# Altium PCB Than_.PcbDoc
Units mm, origin at the board's own origin, x right, y up, seen from the top; angles counter-clockwise.
Board outline 50.8 x 51.18 mm, 2 copper layers (Top Layer, Bottom Layer); 48 components, 41 nets, 161 pads, 79 vias.
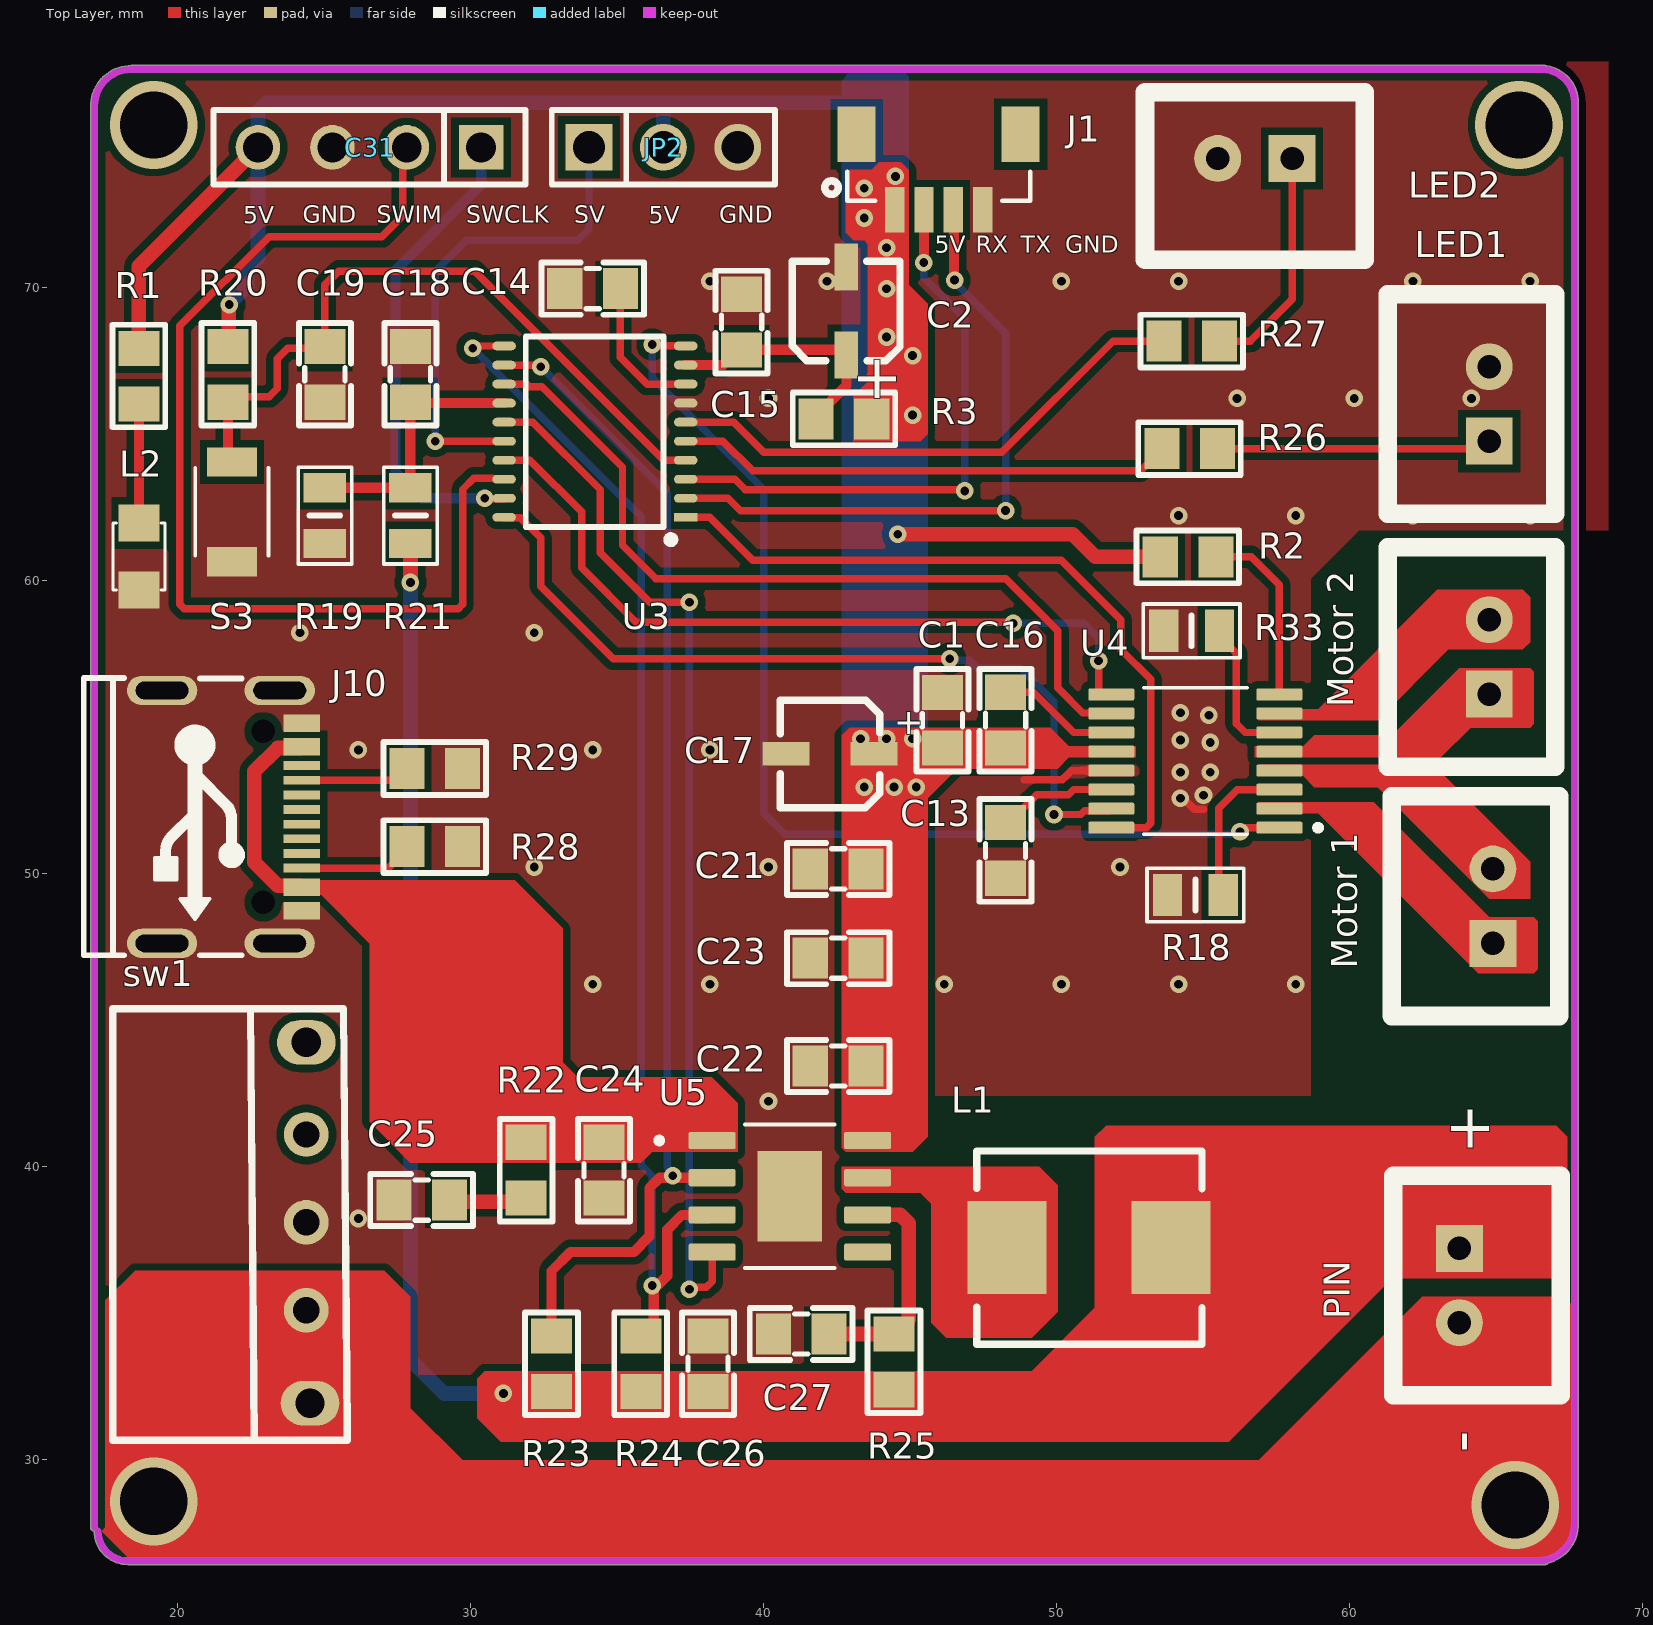
[diagram p0: Top Layer view]
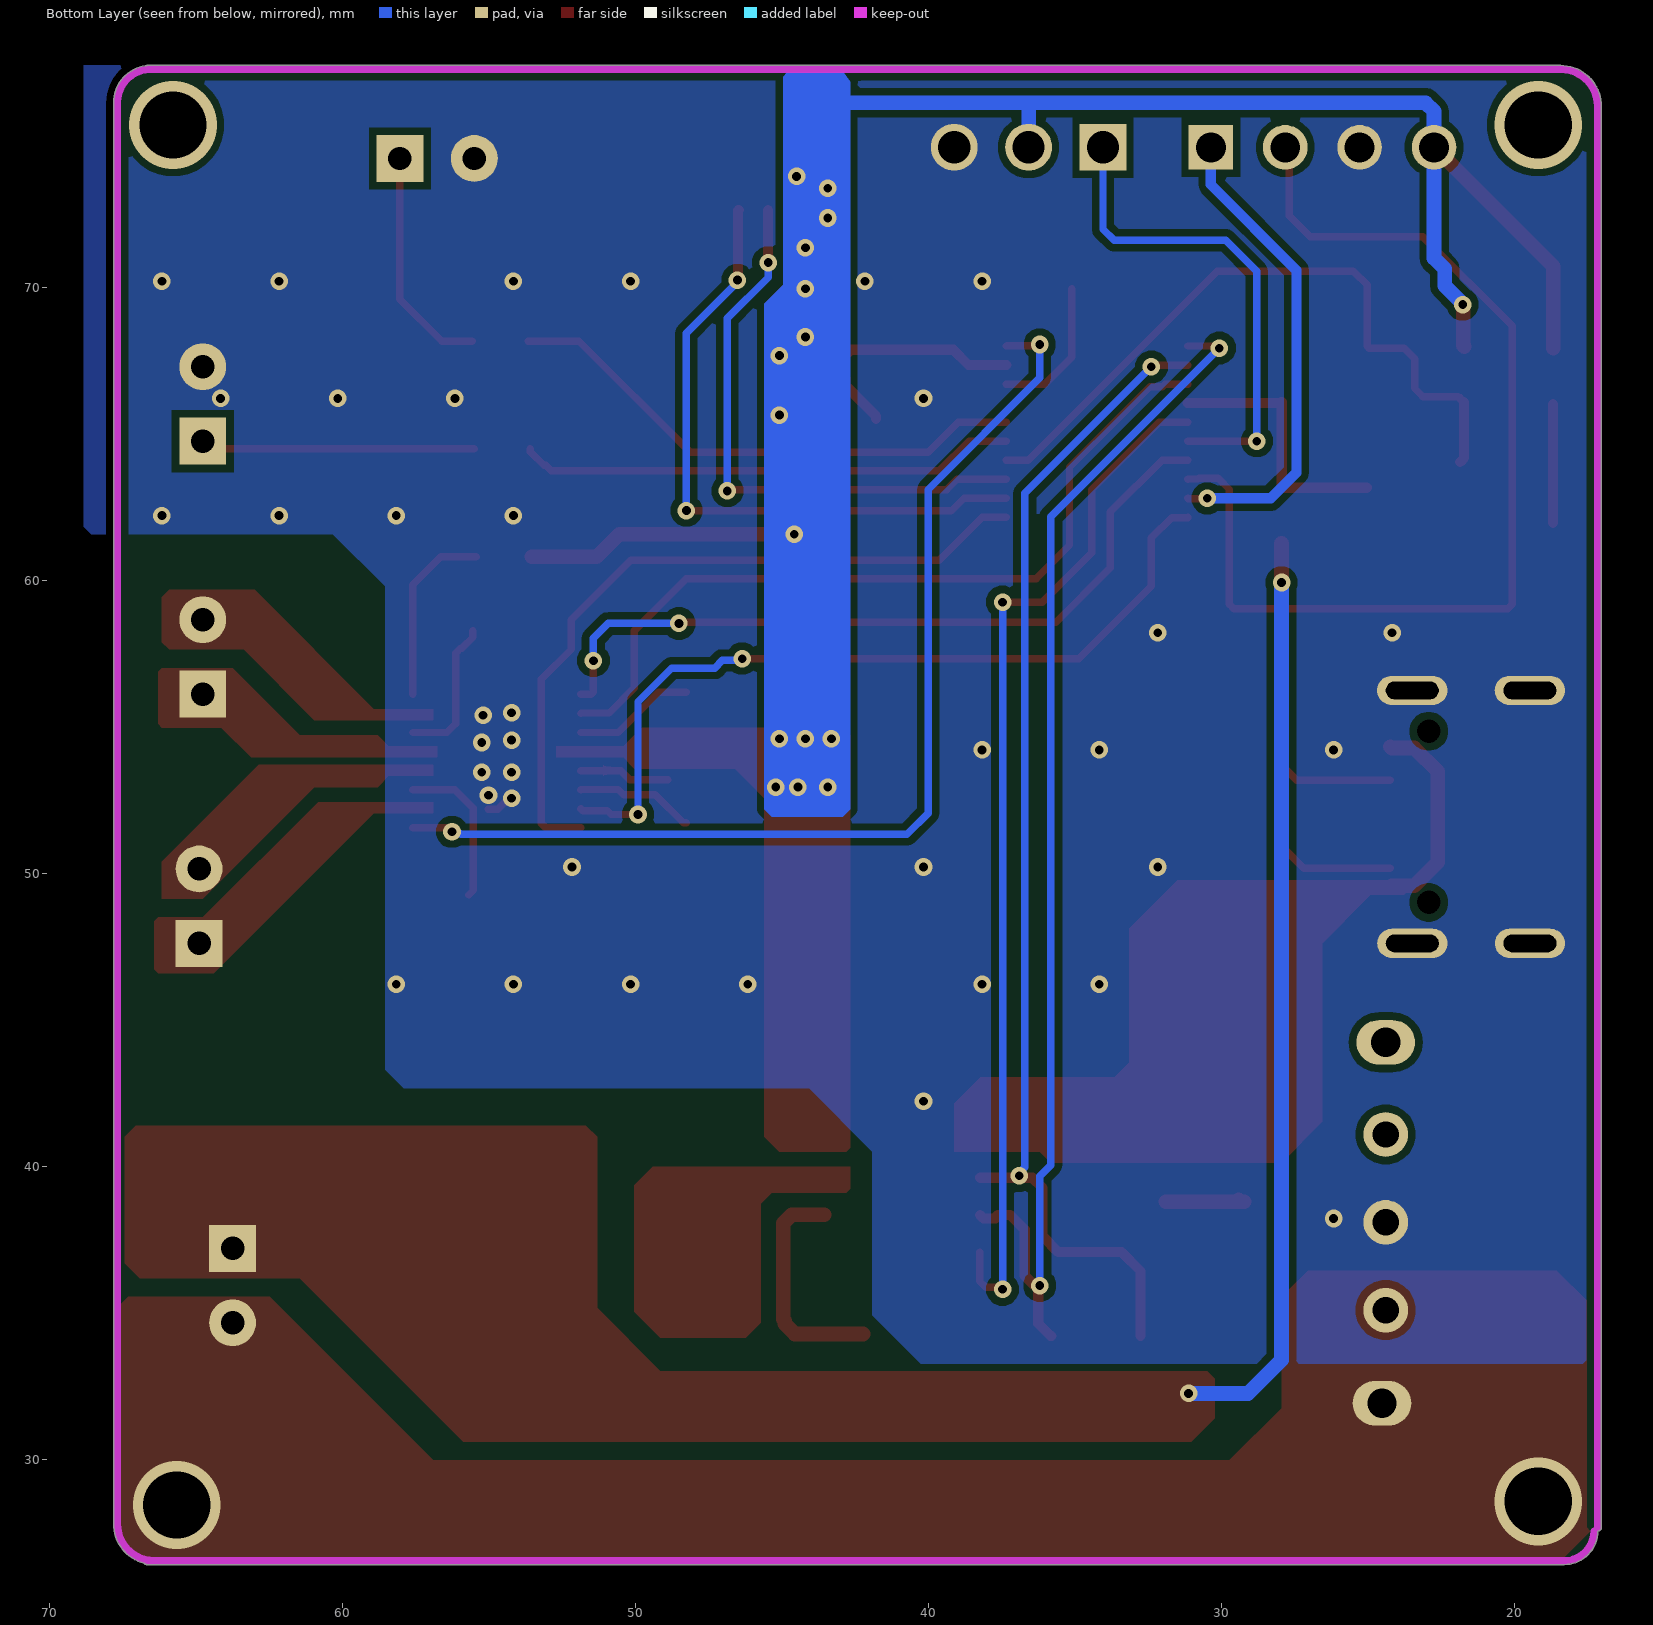
[diagram p1: Bottom Layer view, seen from below]
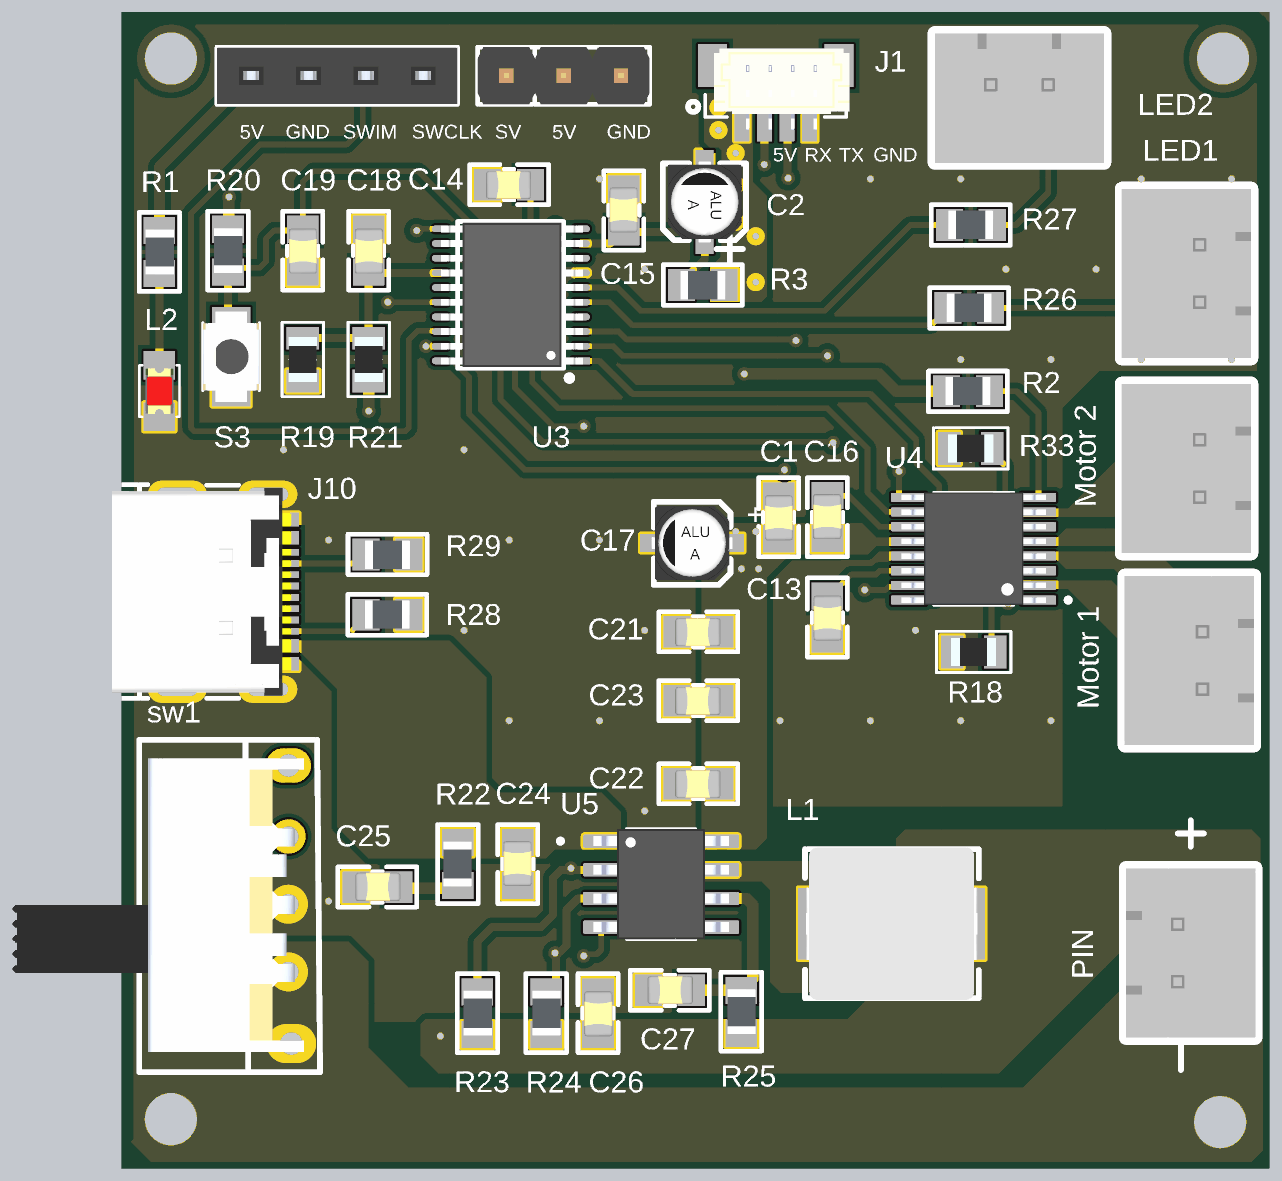
[diagram p2: 3D render of the assembled board from above, using the file's embedded part models]

## Layer stack, top to bottom
Top Solder: solder mask 0.0102, Solder Resist, Dk 3.5
Top Layer: signal copper 0.0356
Dielectric 1: dielectric 0.32, FR-4, Dk 4.8
Bottom Layer: signal copper 0.0356
Bottom Solder: solder mask 0.0102, Solder Resist, Dk 3.5

## Board outline
18.288,26.416 cw(c18.288,27.559) 17.145,27.559 cw(c17.145,27.686) 17.018,27.686 17.018,76.2 cw(c18.415,76.2) 18.415,77.597 66.675,77.597 cw(c66.675,77.47) 66.732,77.584 cw(c66.548,76.327) 67.818,76.327 67.818,27.813 cw(c66.421,27.813) 66.772,26.46 cw(c66.675,26.543) 66.675,26.416

## Design rules (kind name [scope] priority, off if disabled: settings)
Clearance [All] p1: gap=0.254 ignorepadtopadclearanceinfootprint=FALSE
PolygonConnect [All] p1: connectstyle=Direct reliefconductorwidth=0.254 reliefentries=4 polygonreliefangle="90 Angle" airgapwidth=0.254
RoomDefinition Than [InComponentClass('Than')] p1: confinementstyle=ConfineIn formatcopy=TRUE lockcomponents=FALSE outline 69.977,27.94 83.947,27.94 83.947,50.673 69.977,50.673
RoutingVias [All] p1: holewidth=0.3 width=0.6 viastyle="Through Hole" minholewidth=0.3 minwidth=0.6 maxholewidth=0.3 maxwidth=0.6
SolderMaskExpansion [All] p1: expansion=0.102 istentingtop=FALSE
Width [All] p1: maxlimit=0.5 minlimit=0.254 preferedwidth=0.35
30 further rules are at their usual default settings.

## Components (designator, comment, footprint, x,y, rotation, side; value= is the part's Value field where it differs from the comment)
C1 "100nF" "Cap 0805" 46.101,55.245 r270 top
C2 "100uF" CAP-ALUM-3054-TYPE-A 42.799,69.215 r90 top
C13 "2,2uF" "Cap 0805" 48.26,50.8 r270 top
C14 "10uF" "Cap 0805" 34.163,69.977 r180 top
C15 "100nF" "Cap 0805" 39.243,68.834 r90 top
C16 "0.01uF" "Cap 0805" 48.26,55.245 r90 top
C17 "100uF" CAP-ALUM-3054-TYPE-A 42.267,54.077 r180 top
C18 "100nF" "Cap 0805" 27.94,67.056 r270 top
C19 "100nF" "Cap 0805" 25.019,67.056 r270 top
C21 "22uF" "Cap 0805" 42.545,50.165 r180 top
C22 "22uF" "Cap 0805" 42.545,43.434 r180 top
C23 "22uF" "Cap 0805" 42.545,47.117 r180 top
C24 "10uF" "Cap 0805" 34.544,39.878 r90 top
C25 "10uF" "Cap 0805" 28.321,38.862 r0 top
C26 "22uF" "Cap 0805" 38.1,33.274 r270 top
C27 "22uF" "Cap 0805" 41.275,34.29 r0 top
C31 "JP4" JP4-C1T 30.353,74.803 r180 top
J1 "Header 4pin 1.0mm" "CONN4_BM04B-SRSS_JST - duplicate" 45.974,74.549 r0 top
J10 "USB TYPE C" "USB type c CAM" 21.844,51.943 r270 top
JP2 "Servo" "JP 1x3 DT" 34.036,74.803 r0 top
L1 "1uH" IND-SMD-CIP0650 51.054,37.338 r0 top
L2 "LED 0805" LED-0805-Red 18.669,61.976 r270 top
LED1 "Led1" XH2.54M-2 64.77,64.77 r90 top (schematic designator Led1)
LED2 "Led2" XH2.54M-2 58.039,74.422 r180 top (schematic designator Led2)
"Motor 1" "Motor 1" XH2.54M-2 64.897,47.625 r90 top
"Motor 2" "Motor 2" XH2.54M-2 64.77,56.134 r90 top
PIN "pin" XH2.54M-2 63.754,37.211 r270 top
R1 "1K" "RES 0805" 18.679,66.994 r270 top
R2 "10K" "RES 0805" 54.483,60.833 r0 top
R3 "10K" "RES 0805" 42.742,65.522 r180 top
R18 "200mR" RES-0805 54.737,49.276 r180 top
R19 "100k" RES-0805 25.019,62.23 r270 top
R20 "10K" "RES 0805" 21.717,67.056 r270 top
R21 "100k" RES-0805 27.94,62.23 r90 top
R22 "2R" "RES 0805" 31.877,39.878 r90 top
R23 "3K" "RES 0805" 32.766,33.274 r270 top
R24 "3K" "RES 0805" 35.814,33.274 r270 top
R25 "0.5R" "RES 0805" 44.46,33.339 r270 top
R26 "1K" "RES 0805" 54.54,64.526 r0 top
R27 "1K" "RES 0805" 54.61,68.199 r0 top
R28 "5.1K" "RES 0805" 28.764,50.937 r0 top
R29 "5.1K" "RES 0805" 28.772,53.584 r180 top
R33 "200mR" RES-0805 54.61,58.293 r180 top
S3 "SW-SMD" SW_B3U-1000P 21.844,62.357 r270 top
sw1 "sw_ss 12f23g5" "sw_ss 12f23g5" 27.178,31.29 r90 top
U3 "APM32F003F6P6" APM32F003F6P6 37.338,62.17 r180 top locked
U4 "DRV8833PW" DRV88833 54.737,53.848 r180 top
U5 "IP5306" Ip5306_SOP127P600X165-9N 40.894,38.989 r0 top

## Footprints (in the part's own frame and the unit in brackets; to place one, negate y for a bottom-side part, rotate by r counter-clockwise, add the part's x,y. Pads: shape width x height; smd on the part's side, far side on the other; paste and mask are expansions set on the pad)
APM32F003F6P6 [mm]
  rect 0.8x0.3 smd: 1(0,0)
  oval 0.8x0.3 smd: 2(0,-0.65) 3(0,-1.3) 4(0,-1.95) 5(0,-2.6) 6(0,-3.25) 7(0,-3.9) 8(0,-4.55) 9(0,-5.2) 10(0,-5.85) 11(6.2,-5.85) 12(6.2,-5.2) 13(6.2,-4.55) 14(6.2,-3.9) 15(6.2,-3.25) 16(6.2,-2.6) 17(6.2,-1.95) 18(6.2,-1.3) 19(6.2,-0.65) 20(6.2,0)
  silkscreen extent 0.38,-6.18 5.46,0.89, body extent -0.1,-6.12 6.2,0.28, height 1
"Cap 0805" [mm] "Compoment SMD 80x50mil"
  rect 1.2x1.4 smd: 1(-0.946,-0.003) 2(0.954,-0.003)
  silkscreen extent -1.75,-0.89 1.75,0.89, body extent -0.97,-0.61 1.03,0.64, height 1.23
CAP-ALUM-3054-TYPE-A [mm]
  rect 1.6x0.8 smd: 1(-1.5,-0.025) 2(1.5,-0.025)
  silkscreen extent -1.7,-1.85 1.7,1.83, body extent -1.8,-1.68 1.8,1.62, height 5.4
"CONN4_BM04B-SRSS_JST - duplicate" [mil]
  rect 26x61 smd: 1(-59.06,-74.1) 2(-19.68,-74.1) 3(19.68,-74.1) 4(59.06,-74.1)
  rect 51x75 smd: 5(-110.24,27.47) 6(110.24,27.47)
  silkscreen extent -153,-62 123,-23, body extent -108,-85 128,57, height 171
DRV88833 [mm]
  rrect25% 1.57x0.41 smd: 1(-2.87,2.275) 2(-2.87,1.625) 3(-2.87,0.975) 4(-2.87,0.325) 5(-2.87,-0.325) 6(-2.87,-0.975) 7(-2.87,-1.625) 8(-2.87,-2.275) 9(2.87,-2.275) 10(2.87,-1.625) 11(2.87,-0.975) 12(2.87,-0.325) 13(2.87,0.325) 14(2.87,0.975) 15(2.87,1.625) 16(2.87,2.275)
  silkscreen extent -4.29,-2.5 1.77,2.5, body extent -3.2,-2.5 3.2,2.5, height 1.2
IND-SMD-CIP0650 [mm]
  rect 2.7x3.18 smd: 1(-2.744,-0.102) 2(2.846,-0.102)
  silkscreen extent -3.78,-3.4 3.91,3.2, body extent -3.75,-3.48 3.85,3.27, height 5.2
Ip5306_SOP127P600X165-9N [mm]
  rrect25% 1.61x0.59 smd: 1(-2.655,1.905) 2(-2.655,0.635) 3(-2.655,-0.635) 4(-2.655,-1.905) 5(2.655,-1.905) 6(2.655,-0.635) 7(2.655,0.635) 8(2.655,1.905)
  rect 2.21x3.1 smd paste-3: 9(0,0)
  silkscreen extent -4.56,-2.45 1.53,2.45, body extent -3,-2.45 3,2.45, height 1.65
JP4-C1T [mm] "4 row, straight, gold plating"
  rect 1.52x1.52 hole 1.02: 1(0,0)
  round 1.52 hole 1.02: 2(2.54,0) 3(5.08,0) 4(7.62,0)
  silkscreen extent -1.52,-1.27 9.14,1.27, body extent -1.52,-1.25 9.14,1.25, height 8.51
"JP 1x3 DT" [mm]
  rect 1.6x1.6 hole 1.1: 1(0,0)
  round 1.6 hole 1.1: 2(2.54,0) 3(5.08,0)
  silkscreen extent -1.27,-1.27 6.35,1.27, body extent -1.27,-1.27 6.35,1.27, height 8.54
LED-0805-Red [mil]
  rect 50x55 smd: 1(0,0) 2(90,0)
  silkscreen extent 0,-35 90,35, body extent 5,-25 85,25, height 43
"RES 0805" [mm]
  rect 1.2x1.4 smd: 1(-0.946,-0.01) 2(0.954,-0.01)
  silkscreen extent -1.75,-0.91 1.75,0.89, body extent -1,-0.62 1,0.63, height 0.5
RES-0805 [mm] "10k Ohm Thick Film Resistors �1% �100ppm/? 0805 Chip Resistor - Surface Mount"
  rect 1x1.45 smd: 1(-0.95,0) 2(0.95,0)
  silkscreen extent -1.65,-0.91 1.65,0.91, body extent -1,-0.63 1,0.63, height 0.65
SW_B3U-1000P [mm]
  rect 1x1.7 smd: 1(-1.7,0) 2(1.7,0)
  silkscreen extent -1.5,-1.25 1.5,1.25, body extent -2,-1.25 2,1.25, height 1.75
"sw_ss 12f23g5" [mil]
  round 60 hole 35.43: 1(150,110) 2(268.11,110) 3(386.22,110)
  oval 60x78.74 hole 39.37: ""(25,105) ""(510,110)
  silkscreen extent -25,55 555,370, body extent 11,83 522,591, height 207
"USB type c CAM" [mm]
  rect 0.6x1.25 smd: A1(-3.2,2.385) A4(-2.4,2.385) A9(2.4,2.385) A12(3.2,2.385)
  rect 0.3x1.25 smd: A5(-1.25,2.385) A6(-0.25,2.385) A7(0.25,2.385) A8(1.25,2.385) B5(1.75,2.385) B6(0.75,2.385) B7(-0.75,2.385) B8(-1.75,2.385)
  round 0.4 hole 0.8 unplated: MH1(-2.921,1.072) MH2(2.921,1.072)
  oval 1x2.4 hole 1.8 slot 0.6 at 0 deg: MH3(-4.318,1.634) MH4(4.318,1.631) MH5(-4.318,-2.382) MH6(4.318,-2.385)
  silkscreen extent -4.75,-5.06 4.72,0.34, body extent -4.6,-5.28 4.6,2.67, height 3.2
XH2.54M-2 [mm]
  rect 1.6x1.6 hole 0.8: 1(0,0)
  round 1.6 hole 0.8: 2(2.54,0)
  silkscreen extent -2.48,-2.26 5.02,3.46, body extent -2.48,-2.26 5.02,3.48, height 6.91

## Part data
C1 C13 C14 C15 C16 C18 C19 C21 C22 C23 C24 C25 C26 C27: library part "Cap 0805", "Capacitor SMD 0805"
C2 C17: library part CAP-ALUM-SMD, "CASE-A-3216-18(mm) Aluminum Capacitors"
C31: "WR-PHD 2.54 mm Angled Socket Header", Manufacturer="W¨¹rth Elektronik eiSos GmbH", partNo=613004143121, ComponentLink1 Description=Manufacturer, ComponentLink1URL=http://www.we-online.com, ComponentLink2 Description=Datasheet, ComponentLink2URL=http://katalog.we-online.de/em/datasheet/6130xx143121.pdf, Created by="Karrer Zheng", Created Date="29 March 2013", NoPins=04
J1: "Connector Header Surface Mount, Right Angle 4 position 0.039 (1.00mm)", Package=None, Check_prices=https://www.snapeda.com/parts/SM04B-SRSS-TB/JST/view-part/?ref=eda, MF="JST Sales", MP=SM04B-SRSS-TB, SnapEDA_Link=https://www.snapeda.com/parts/SM04B-SRSS-TB/JST/view-part/?ref=snap
J10: "Connector", Manufacturer_Name="GCT (GLOBAL CONNECTOR TECHNOLOGY)", Manufacturer_Part_Number=USB4800-03-A, Mouser Part Number=640-USB4800-03-A, Datasheet Link=https://gct.co/connector/usb4800, Height=5.58mm, Mouser Price/Stock=https://www.mouser.co.uk/ProductDetail/GCT/USB4800-03-A?qs=vvQtp7zwQdMkfG8vViEZoQ%3D%3D
JP2: library part "JP 1x3 2.54 Duc Thang", "Cắm", Chung_Loai=Cắm, Don_Vi=Con, Ma_Hang=MH000903, Ten_Linh_Kien="Jump Đơn Đực 2.54MM 1x40P Thẳng 11MM"
L1: library part INDUCTOR, "_mA _nH  ±5% 0__ Inductors (SMD)"
L2: library part "LED 0805 Do", "Dán", Chung_Loai=Dán, Don_Vi=Con, Ma_Hang=MH000897, Ten_Linh_Kien="LED 0805 Màu Đỏ (Red)"
LED1 LED2 "Motor 1" "Motor 2" PIN: library part "Header 2P 2.54 Duc Thang", "Cắm", Chung_Loai=Cắm, Don_Vi=Con, Ma_Hang=MH001283, Ten_Linh_Kien="Header 2P XH2.54-2P Đực Thẳng"
R1 R2 R3 R20 R22 R23 R24 R25 R26 R27 R28 R29: library part "RES 0805", "RES SMD 0805", Manufacturer="Vishay Dale", Manufacturer Part Number=CRCW040210K0FKED, Operating Temperature="-55°C ~ 155°C", Package / Case="0402 (1005 Metric)", Power (Watts)="0.063W, 1/16W", Resistance (Ohms)=10k, Supplier Part Number 1=541-10.0KLCT-ND, Temperature Coefficient=±100ppm/°C, Tolerance=±1%, Category=Resistors, ComponentLink1Description=http://www.vishay.com/docs/20035/dcrcwe3.pdf, ComponentLink1URL=http://www.vishay.com/docs/20035/dcrcwe3.pdf, Composition="Thick Film", Features="Automotive AEC-Q200", Height="0.016\" (0.40mm)", Number of Terminations=2, Packaging="Cut Tape (CT)", Pricing 1="10=0.083, 50=0.0444, 200=0.0255, 1000=0.0174 (USD)", RoHS="RoHS Compliant", Size / Dimension="0.039\" L x 0.020\" W (1.00mm x 0.50mm)", Stock 1=2392462, Supplier 1=Digi-Key, Supplier Device Package="0402 (1005 Metric)"
R18 R19 R21 R33: library part "RES-SMD 0805", "_ Ohm Thick Film Resistors ±1% ±100ppm/℃ 0805 Chip Resistor - Surface Mount", Supplier Part Number 1=HCJ0805ZT0R00, Supplier 1=Avnet
S3: "Switch", LatestRevisionDate=17-Jul-2002, LatestRevisionNote="Re-released for DXP Platform.", PackageReference=SPST-2, Published=24-Mar-1999, Publisher="Altium Limited"
U4: "10.8-V, 2-A dual H-bridge motor driver with current regulation", Package="TSSOP-16 Texas Instruments", Check_prices=https://www.snapeda.com/parts/DRV8833PW/Texas+Instruments/view-part/?ref=eda, MF="Texas Instruments", MP=DRV8833PW, SnapEDA_Link=https://www.snapeda.com/parts/DRV8833PW/Texas+Instruments/view-part/?ref=snap
U5: "Fully-Integrated Power Bank System-On-Chip with 2.1A charger, 2.4A discharger", Package="SOIC-4 INJOINIC", Check_prices=https://www.snapeda.com/parts/IP5306/Injoinic/view-part/?ref=eda, MF=Injoinic, MP=IP5306, SnapEDA_Link=https://www.snapeda.com/parts/IP5306/Injoinic/view-part/?ref=snap

## Via types
v1: diameter 0.6, hole 0.3, Top Layer to Bottom Layer, tented both sides, 68 vias
v2: diameter 0.6, hole 0.3, Top Layer to Bottom Layer, 7 vias
v3: diameter 3, hole 2.3, Top Layer to Bottom Layer, 4 vias

## Nets (pads, with @x,y where several pads share a name; then routed paths per layer and width w, separated by ;. In a path a pad name is that pad's centre, name@x,y a point inside that pad or via, vN(x,y) a via of type N, cw(c..) or ccw(c..) an arc to the next point about the centre after c; other vN are vias at no path point)
+5: C1.2 C16.1 C17.1 C21.1 C22.1 C23.1 C31.4 J1.1 JP2.2 R1.1 R2.1 R3.1 R20.1 U4.12 U5.8 | length 62.3
  Top Layer w0.5: R1.1 18.669,70.739 C31.4 ; R20.1 21.736,68.031 21.736,69.414 v1(21.755,69.433) ; v2(43.434,73.406) 43.453,73.387 43.453,73.006 43.561,72.898 ; R3.1 43.766,65.61 43.766,66.982 44.474,67.69 v2@44.474,68.326 ; v2(44.196,68.326) v2@44.196,68.58 ; v2(44.196,71.374) v2@44.196,71.628 ; 44.474,68.58 v2@44.474,71.374 ; 44.474,71.628 J1.1 44.474,72.691 44.462,72.703 44.486,72.727 44.486,73.796 v1(44.498,73.808) ; v1(44.577,61.595) 50.546,61.595 51.318,60.823 R2.1 ; v2@44.958,67.564 v2(45.085,67.691) ; v2(45.085,65.659) v2@45.212,65.659
  Bottom Layer w0.254: v1(43.307,54.61) v1@43.434,54.737 ; v1(43.434,52.959) v1@43.561,53.086 ; v1@44.323,52.959 v1(44.45,52.959) ; v1@45.085,52.832 v1(45.212,52.959) ; v1(45.085,54.61) v1@45.212,54.737
  Bottom Layer w0.5: v1(21.755,69.433) 21.755,69.46 22.37,70.075 22.37,70.657 22.733,71.02 C31.4 22.733,76.034 23.026,76.327 36.576,76.327 ; JP2.2 36.576,76.327 ; v1(44.498,73.808) 44.498,73.835 44.45,73.884 44.45,76.034 44.157,76.327 36.576,76.327
  other v1: 44.196,54.61
  other v2: 44.196,69.977 43.434,72.39
BAT: C26.2 L1.2 PIN.1 R21.1 R23.2 R24.2 R25.2 | length 31.5
  Top Layer w0.5: v1(27.94,59.944) R21.1
  Bottom Layer w0.5: v1(27.94,59.944) 27.94,33.401 29.083,32.258 v1(31.115,32.258)
BIN1: U3.17 U4.9 | length 26.2
  Top Layer w0.254: U3.17 32.019,64.12 33.782,62.357 33.782,60.452 35.641,58.593 47.826,58.593 47.833,58.586 48.475,58.586 v1(48.514,58.547) ; v1(51.435,57.277) 51.435,56.201 51.513,56.123 U4.9
  Bottom Layer w0.254: v1(48.514,58.547) 50.927,58.547 51.435,58.039 v1(51.435,57.277)
BIN2: U3.13 U4.10 | length 28.1
  Top Layer w0.254: U3.13 31.919,66.72 32.01,66.629 32.431,66.629 35.179,63.881 35.179,61.214 36.322,60.071 48.26,60.071 50.038,58.293 50.038,56.346 50.893,55.49 51.85,55.49 U4.10
GND: C1.1 C2.2 C13.2 C14.2 C15.2 C17.2 C18.1 C19.2 C21.2 C22.2 C23.2 C24.1 C25.1 C26.1 C27.1 C31.3 J1.4 J10.A1 J10.A12 J10.MH3 J10.MH4 J10.MH5 J10.MH6 JP2.3 L2.2 LED1.2 LED2.2 R18.2 R19.2 R28.2 R29.1 R33.2 S3.2 sw1.2 U3.7 U4.13 U5.9 | length 4.1
  Top Layer w0.254: 48.895,53.213 50.196,53.213 50.506,53.523 U4.13 ; v1(54.229,52.578) 54.323,52.578 54.704,52.197 55.025,52.197 ; v1@54.991,52.705 v1(55.016,52.68) v1@55.038,52.702
  other v1: 26.164,38.231 40.164,42.231 34.164,46.231 38.164,46.231 46.164,46.231 50.164,46.231 54.164,46.231 58.164,46.231 32.164,50.231 40.164,50.231 52.164,50.231 54.229,53.467 55.245,53.467 26.164,54.231 34.164,54.231 38.164,54.231 55.245,54.483 54.229,54.564 55.199,55.416 54.229,55.499 24.164,58.231 32.164,58.231 54.164,62.231 58.164,62.231 62.164,62.231 66.164,62.231 40.164,66.231 56.164,66.231 60.164,66.231 64.164,66.231 38.164,70.231 42.164,70.231 50.164,70.231 54.164,70.231 62.164,70.231 66.164,70.231
GND_BAT: PIN.2 sw1.1
IN1: U3.1 U4.16 | length 25.1
  Top Layer w0.254: U3.1 38.16,62.17 39.624,60.706 50.165,60.706 52.197,58.674 52.197,57.658 53.213,56.642 53.213,51.722 53.064,51.573 U4.16
IN2: U3.20 U4.15 | length 28.2
  Top Layer w0.254: U3.20 31.147,62.161 31.692,62.161 32.385,61.468 32.385,59.817 34.857,57.345 v1(46.355,57.345) ; v1(49.911,52.024) 50.819,52.024 50.954,52.159 51.803,52.159 U4.15
  Bottom Layer w0.254: v1(46.355,57.345) 46.416,57.284 47.036,57.284 47.297,57.023 48.768,57.023 49.911,55.88 v1(49.911,52.024)
INT: U3.15 U5.4 | length 35.5
  Top Layer w0.254: U3.15 32.116,65.42 34.417,63.119 34.417,60.96 36.103,59.274 v1(37.465,59.274) ; v1(37.465,35.814) 37.531,35.88 38.039,35.88 38.239,36.08 U5.4
  Bottom Layer w0.254: v1(37.465,35.814) v1(37.465,59.274)
LED1: R26.1 U3.5 | length 17.1
  Top Layer w0.254: U3.5 38.608,64.77 39.624,63.754 52.867,63.754 53.056,63.943 53.121,63.943 53.594,64.416 R26.1
LED2: R27.1 U3.6 | length 18.3
  Top Layer w0.254: U3.6 38.974,65.42 40.005,64.389 48.133,64.389 51.933,68.189 R27.1
NetC2_1: C2.1 C15.1 R3.2 U3.9 | length 8.4
  Top Layer w0.254: C2.1@42.824,66.929 C2.1
  Top Layer w0.35: U3.9 38.628,67.37 39.146,67.888 C15.1 42.651,67.888 C2.1 ; R3.2 41.788,65.632 42.824,66.668 C2.1@42.824,66.929
NetC13_1: C13.1 U4.14 | length 4.1
  Top Layer w0.254: C13.1 48.357,51.746 49.316,52.705 50.406,52.705 50.579,52.878 51.862,52.878 U4.14
NetC14_1: C14.1 U3.8 | length 5
  Top Layer w0.254: C14.1 35.109,67.634 36.023,66.72 U3.8
NetC16_2: C16.2 U4.11 | length 4.2
  Top Layer w0.254: C16.2 49.211,56.199 50.587,54.823 U4.11
NetC25_2: C25.2 R22.1 | length 2.7
  Top Layer w0.5: C25.2@29.211,38.801 31.883,38.801 R22.1@31.887,38.805 ; C25.2@29.398,38.863 C25.2@29.402,38.859
NetC27_2: C27.2 R25.1 U5.6 | length 7.9
  Top Layer w0.5: C27.2@42.229,34.286 R25.1@44.549,34.286 ; U5.6 44.665,38.354 44.958,38.061 44.958,34.793 44.9,34.735 44.9,34.635 44.55,34.285 R25.1
NetJ10_A5: J10.A5 R29.2 | length 3.8
  Top Layer w0.254: J10.A5 27.417,53.193 R29.2
NetJ10_B5: J10.B5 R28.1 | length 4
  Top Layer w0.254: J10.B5 27.184,50.193 27.818,50.827 R28.1
NetL1_1: L1.1 U5.7
NetL2_1: L2.1 R1.2 | length 4.1
  Top Layer w0.35: L2.1 R1.2
NetLed1_1: LED1.1 R26.2 | length 9.5
  Top Layer w0.254: R26.2 63.246,64.516 LED1.1@65.024,64.516
NetLed2_1: LED2.1 R27.2 | length 8.1
  Top Layer w0.254: R27.2 56.616,68.189 58.039,69.612 LED2.1 ; LED2.1@57.404,74.422 LED2.1@57.531,74.295
"NetMotor 1_1": "Motor 1.1" U4.2
"NetMotor 1_2": "Motor 1.2" U4.4
"NetMotor 2_1": "Motor 2.1" U4.5
"NetMotor 2_2": "Motor 2.2" U4.7
NetR2_2: R2.2 U4.8 | length 6.3
  Top Layer w0.254: R2.2 56.652,60.823 57.607,59.868 U4.8
NetR18_1: R18.1 U4.3 | length 5.4
  Top Layer w0.254: R18.1 55.533,49.43 55.533,52.233 56.173,52.873 U4.3
NetR33_1: R33.1 U4.6 | length 5
  Top Layer w0.254: R33.1 55.56,58.068 55.933,57.695 55.97,57.695 56.134,57.531 56.134,55.13 56.441,54.823 U4.6
NRST: C19.1 R20.2 S3.1 U3.4 | length 24.1
  Top Layer w0.254: R20.2 21.899,66.294 23.114,66.294 23.39,66.57 23.39,67.586 23.749,67.945 24.959,67.945 C19.1 25.019,68.005 25.019,70.104 25.485,70.57 30.141,70.57 36.591,64.12 U3.4
  Top Layer w0.35: R20.2 21.707,64.194 S3.1
PC4: C18.2 R19.1 R21.2 U3.14 | length 9.1
  Top Layer w0.35: R19.1 R21.2 27.937,63.183 C18.2 ; C18.2@27.94,66.102 27.972,66.07 U3.14
RXD1: J1.2 U3.3 | length 19.9
  Top Layer w0.254: U3.3 39.019,63.47 39.37,63.119 46.817,63.119 v1(46.863,63.073)
  Top Layer w0.35: v1(45.466,70.866) 45.47,70.87 45.47,72.663 J1.2
  Bottom Layer w0.254: v1(45.466,70.866) 45.466,70.358 46.863,68.961 v1(46.863,63.073)
SCK: R23.1 U3.12 U5.2 | length 40.7
  Top Layer w0.254: U3.12 31.147,67.361 32.334,67.361 v1(32.385,67.31)
  Top Layer w0.35: R23.1 32.756,36.439 33.401,37.084 35.56,37.084 36.099,37.623 36.099,39.274 36.449,39.624 U5.2
  Bottom Layer w0.254: v1(32.385,67.31) 36.703,62.992 36.703,39.979 36.897,39.785 v1(36.897,39.691)
SDA: R24.1 U3.11 U5.3 | length 41.7
  Top Layer w0.254: v1(30.066,67.945) 30.159,67.945 30.234,68.02 U3.11
  Top Layer w0.35: R24.1 35.818,34.22 36.243,34.645 v1@36.243,35.989 ; v1(36.195,35.941) v1@36.243,35.989 ; v1@36.243,36.056 v1@36.243,35.989 ; U5.3 38.119,38.234 37.712,38.234 37.712,38.251 37.609,38.354 37.211,38.354 36.703,37.846 36.703,36.271 36.421,35.989 v1@36.243,35.989
  Bottom Layer w0.254: v1(30.066,67.945) 35.814,62.197 35.814,40.056 36.195,39.675 v1(36.195,35.941)
Servo: JP2.1 U3.16 | length 16.8
  Top Layer w0.254: v1(28.783,64.77) U3.16
  Bottom Layer w0.254: v1(28.783,64.77) 28.783,70.566 29.845,71.628 33.655,71.628 34.036,72.009 JP2.1
Sleep: U3.10 U4.1 | length 36.7
  Top Layer w0.254: v1(36.195,68.072) 36.238,68.029 37.329,68.029 U3.10 ; v1(56.261,51.435) 56.355,51.435 56.487,51.568 57.602,51.568 U4.1
  Bottom Layer w0.254: v1(36.195,68.072) 36.195,66.929 40.005,63.119 40.005,52.07 40.732,51.343 55.939,51.343 55.965,51.369 56.195,51.369 v1(56.261,51.435)
SWCLK: C31.1 U3.19 | length 16.4
  Top Layer w0.254: v1(30.476,62.82) 30.485,62.811 31.129,62.811 U3.19
  Bottom Layer w0.35: C31.1 30.353,73.533 27.432,70.612 27.432,63.695 28.307,62.82 v1(30.476,62.82)
  other v1: 30.476,62.82
SWDIO: C31.2 U3.18 | length 36.3
  Top Layer w0.254: C31.2 27.679,74.669 27.679,72.468 26.965,71.755 23.114,71.755 20.066,68.707 20.066,59.204 20.215,59.055 29.569,59.055 29.718,59.204 29.718,63.119 30.1,63.501 30.758,63.501 30.78,63.479 31.129,63.479 U3.18
TXD1: J1.3 U3.2 | length 22.1
  Top Layer w0.254: U3.2 38.78,62.82 39.208,62.392 48.253,62.392 v1(48.26,62.399)
  Top Layer w0.35: J1.3 46.497,72.644 46.497,70.291 v1(46.519,70.268)
  Bottom Layer w0.254: v1(46.519,70.268) 46.519,70.194 48.26,68.453 v1(48.26,62.399)
VIN: C24.2 J10.A4 J10.A9 R22.2 U5.1 | length 7.1
  Top Layer w0.5: J10.A9 24.179,49.593 23.406,49.593 22.606,50.393 22.606,53.493 23.406,54.293 24.179,54.293 J10.A4
pads on no net: J1.5 J1.6 J10.A6 J10.A7 J10.A8 J10.B6 J10.B7 J10.B8 J10.MH1 J10.MH2 sw1. sw1.3 U5.5
copper on no net:
  other v3: 65.659,28.448 19.177,28.575 19.177,75.565 65.786,75.565

## Polygon pours and split planes (outlines as drawn)
GND on Top Layer "GND_L01_P000" (solid, pour order 0): 17.145,77.724 68.834,77.724 68.834,61.722 60.325,61.722 58.674,60.071 58.674,42.418 45.72,42.418 44.577,41.275 44.577,32.893 17.145,32.893
GND on Bottom Layer "GND_L02_P001" (solid, pour order 1): 68.834,77.597 68.834,61.849 68.58,61.595 60.325,61.595 58.547,59.817 58.547,43.307 57.912,42.672 44.069,42.672 41.91,40.513 41.91,34.925 40.259,33.274 17.653,33.274 17.145,33.782 17.145,77.597

## Keep-outs
Keep-Out Layer:
  lines w0.254: 17.145,27.686 17.145,75.565 ; 17.145,74.168 17.145,76.2 cw(c18.415,76.2) 18.415,77.47 66.675,77.47 ; 17.272,27.559 ccw(c18.288,27.559) 18.288,26.543 66.675,26.543 ; 66.421,26.543 ccw(c66.421,27.813) 67.691,27.813 67.691,76.327 ccw(c66.548,76.327) 66.548,77.47

## Other copper
Top Layer:
  region net +5: 43.942,74.295 43.688,74.041 42.926,74.041 42.799,73.914 42.799,71.882 43.053,71.628 43.434,71.628 43.561,71.501 43.561,66.802 43.053,66.294 43.053,64.77 45.339,64.77 45.593,65.024 45.593,69.469 44.958,70.104 44.958,74.041 44.704,74.295
  region net BAT: 51.689,41.402 67.056,41.402 67.437,41.021 67.437,36.703 66.929,36.195 61.468,36.195 55.88,30.607 31.031,30.607 30.226,31.412 30.226,32.766 30.48,33.02 49.149,33.02 51.308,35.179 51.308,41.021
  region net VIN: 31.496,49.784 33.147,48.133 33.147,43.561 33.655,43.053 38.227,43.053 39.116,42.164 39.116,40.513 36.195,40.513 35.814,40.132 27.94,40.132 26.543,41.529 26.543,49.276 23.749,49.276 23.622,49.403 23.622,49.784
  region net GND_BAT: 17.526,35.433 18.542,36.449 27.051,36.449 27.94,35.56 27.94,31.75 29.718,29.972 56.896,29.972 62.484,35.56 66.294,35.56 67.31,35.56 67.564,35.306 67.564,27.178 67.056,26.67 18.288,26.67 17.399,27.559 17.526,27.686
  region net NetL1_1: 49.403,40.005 50.038,39.37 50.038,35.052 49.149,34.163 46.228,34.163 45.72,34.671 45.72,38.735 45.339,39.116 42.799,39.116 42.672,39.243 42.672,40.005
  region net "NetMotor 1_1": 56.896,52.451 60.833,52.451 64.77,48.514 66.294,48.514 66.421,48.387 66.421,46.736 66.294,46.609 64.389,46.609 58.928,52.07 56.896,52.07
  region: 24.892,49.276 26.67,47.498 29.972,47.498 29.972,49.276 29.845,49.403 25.019,49.403
  region net "NetMotor 1_2": 58.42,53.34 58.801,52.959 62.103,52.959 61.849,53.213 61.849,53.594 58.547,53.594 58.42,53.467
  region net "NetMotor 2_1": 58.42,54.229 58.42,54.356 58.801,54.737 61.849,54.737 61.849,54.356 61.595,54.102 61.087,54.102
  region net "NetMotor 1_2": 56.896,53.721 62.865,53.721 66.167,50.419 66.167,49.149 64.77,49.149 60.579,53.34 56.896,53.34
  region net "NetMotor 2_1": 56.769,54.356 61.087,54.356 63.754,57.023 66.167,57.023 66.294,56.896 66.294,55.118 66.167,54.991 64.135,54.991 63.119,53.975 56.769,53.975
  region net "NetMotor 2_2": 56.896,55.626 58.928,55.626 62.992,59.69 65.913,59.69 66.167,59.436 66.167,57.912 65.913,57.658 63.373,57.658 60.96,55.245 56.896,55.245
  region net +5: 45.085,40.513 45.593,41.021 45.593,52.578 46.609,53.594 50.038,53.594 50.419,53.975 51.435,53.975 52.705,53.975 52.705,54.356 50.419,54.356 49.784,54.991 42.926,54.991 42.672,54.737 42.672,40.64 42.799,40.513 42.926,40.513
Bottom Layer:
  region net +5: 42.672,52.197 42.926,51.943 45.339,51.943 45.593,52.197 45.593,69.469 44.958,70.104 44.958,77.216 44.831,77.343 42.894,77.343 42.672,77.047 42.672,76.708

## Silkscreen, mask and mechanical layers (free items; w line width, h text height)
Top Overlay:
  text "String" at 31.623,87.281 h1.52
  text "String" at 41.91,87.027 h1.52
  text "5V" at 22.225,72.009 h1
  text "GND" at 24.257,72.02 h1
  text "SWIM" at 26.797,72.02 h1
  text "SWCLK" at 29.845,72.02 h1
  text "SV" at 33.528,72.02 h1
  text "5V" at 36.068,72.009 h1
  text "GND" at 38.481,72.02 h1
  text "5V" at 45.847,71.004 h1
  text "RX" at 47.244,70.993 h1
  text "TX" at 48.768,70.993 h1
  text "GND" at 50.292,71.004 h1
  text "+" at 63.246,40.64 h1.52
  text "-" at 64.516,30.226 h1.52 r90

## Text inside footprints (layer, text, board x,y; h text height)
C2: Top Overlay "+" at 44.524,66.015 h1.52 r90
C17: Top Overlay "+" at 45.467,55.802 h1.52 r180